# Altium PCB PMI_carte_principale.PcbDoc
Units mil, origin at the board's own origin, x right, y up, seen from the top; angles counter-clockwise.
Board outline 2362.21 x 3543.31 mil, 2 copper layers (Top Layer, Bottom Layer); 41 components, 46 nets, 174 pads, 3 vias.
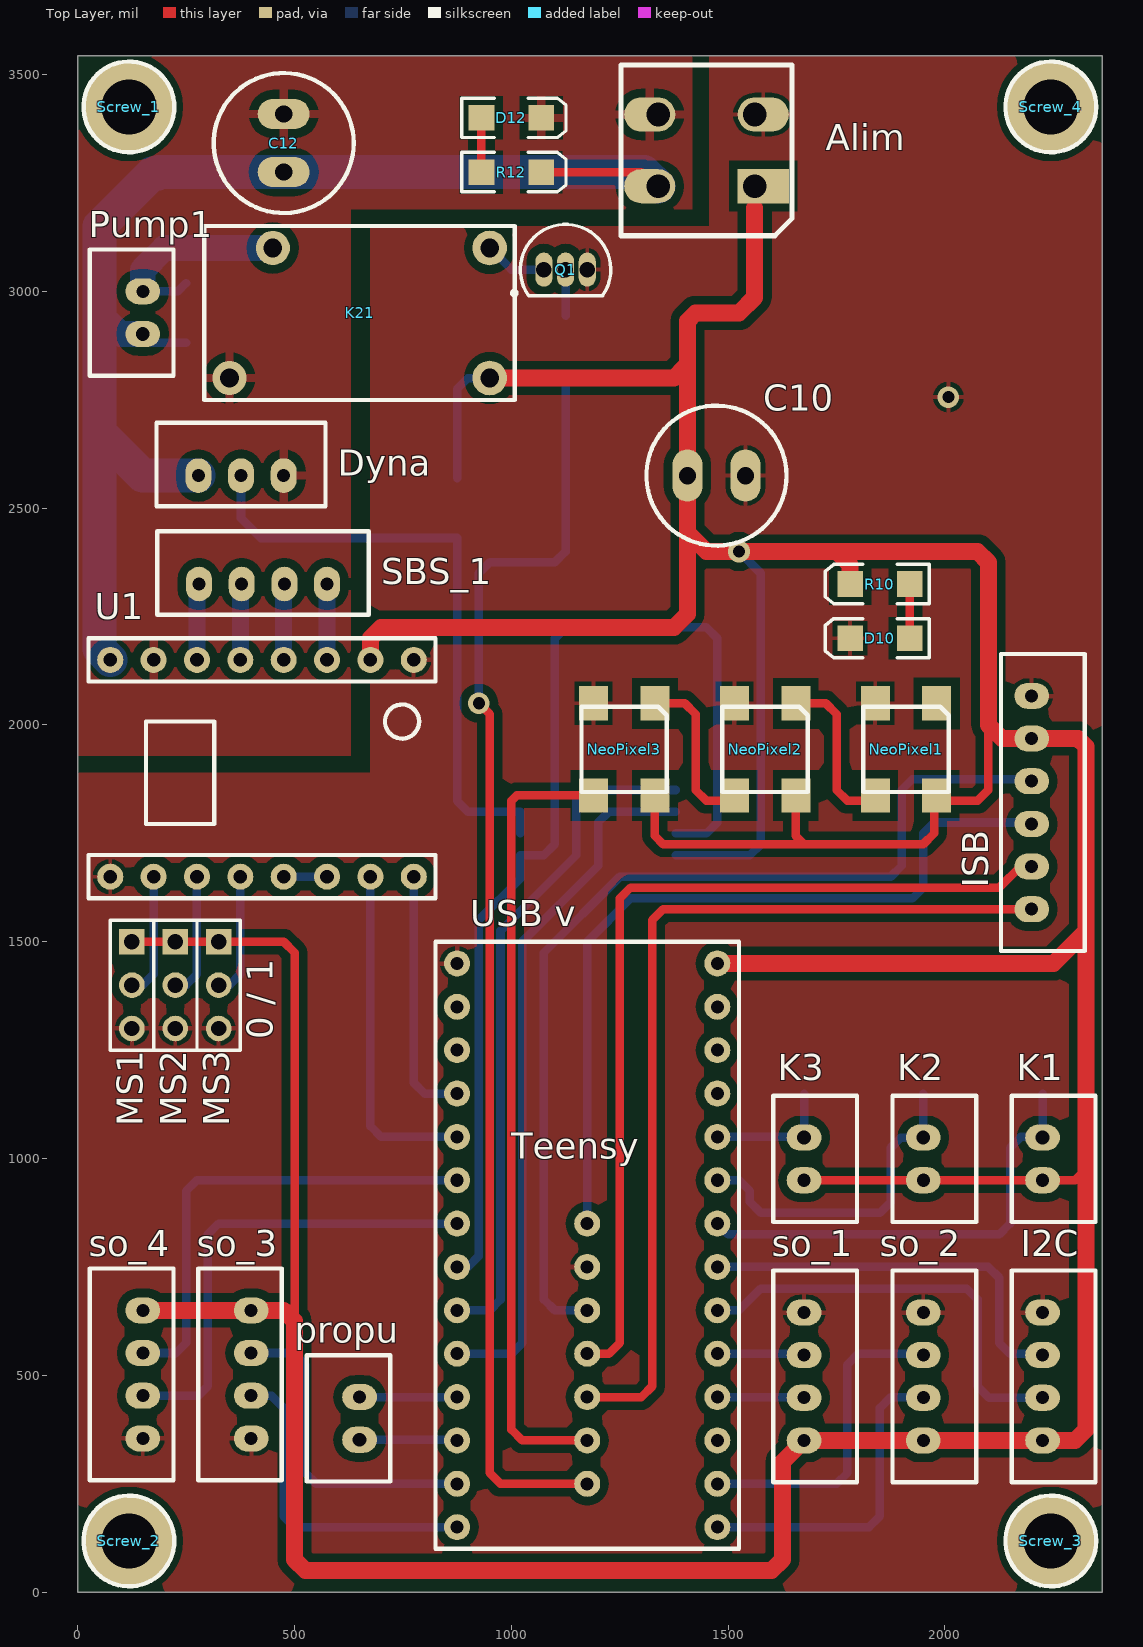
[diagram p0: Top Layer view]
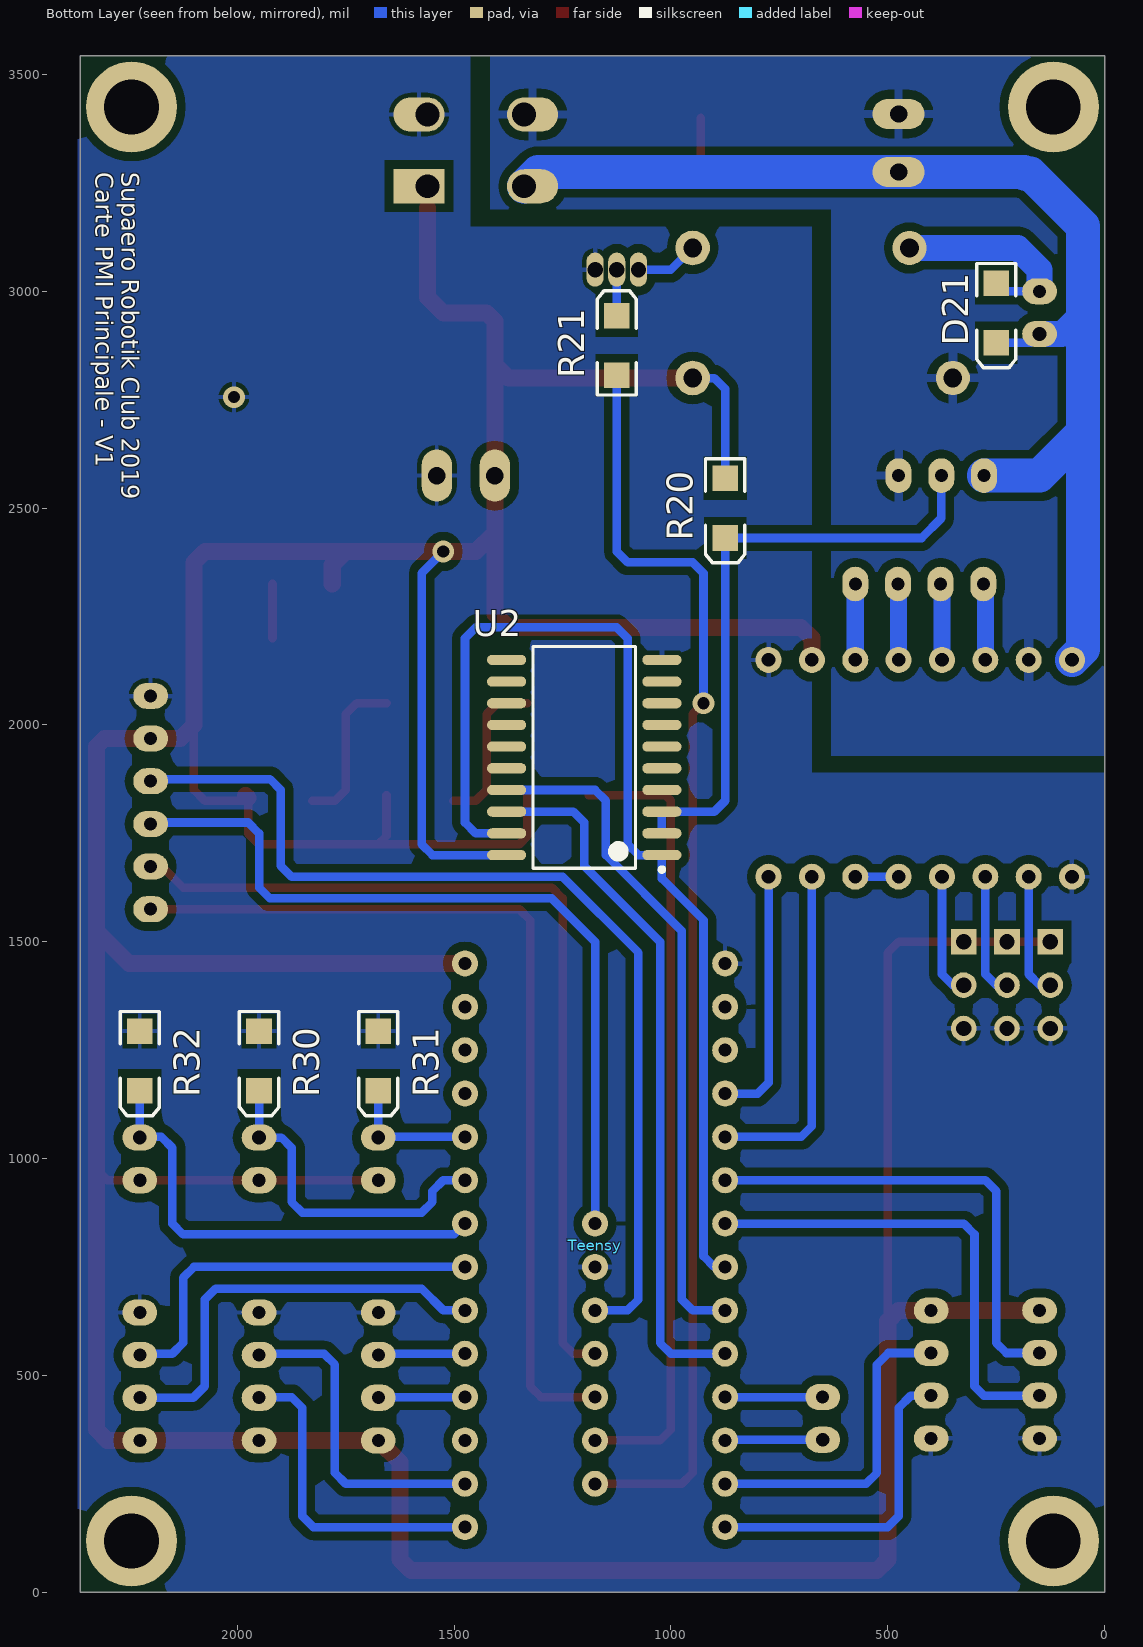
[diagram p1: Bottom Layer view, seen from below]
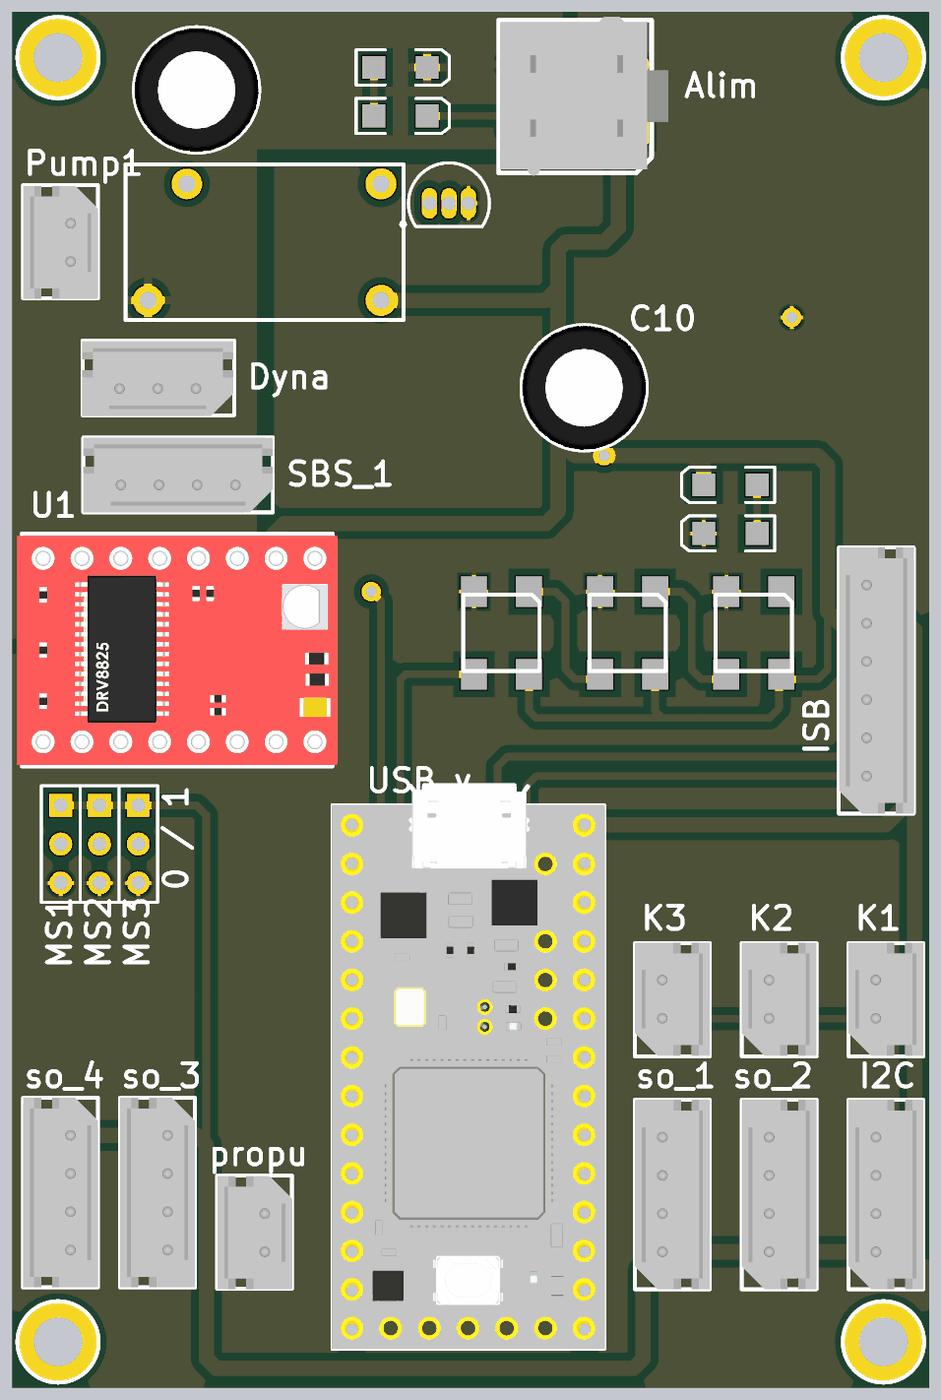
[diagram p2: 3D render of the assembled board from above, using the file's embedded part models]

## Layer stack, top to bottom
Top Solder: solder mask 0.4, Solder Resist, Dk 3.5
Top Layer: signal copper 1.4
Dielectric 1: dielectric 12.6, FR-4, Dk 4.8
Bottom Layer: signal copper 1.4
Bottom Solder: solder mask 0.4, Solder Resist, Dk 3.5

## Board outline
0,0 2362.2,0 2362.21,3543.31 0,3543.31

## Design rules (kind name [scope] priority, off if disabled: settings)
Clearance [All] p1: gap=10 except(20: Arc-Poly Track-Poly SMDPad-Poly THPad-Poly Via-Poly Fill-Poly Poly-Poly Poly-Region Poly-Text)
ComponentClearance Clearance_MS [HasFootprint('HDR1X3') vs HasFootprint('HDR1X3')] p1: gap=0 collisioncheckmode=3 verticalgap=0 showdistances=FALSE
ComponentClearance ComponentClearance_1 [All] p2: gap=10 collisioncheckmode=3 verticalgap=10 showdistances=FALSE
PolygonConnect GN_A [InNet('MASSE_A')] p1: connectstyle=Relief reliefconductorwidth=20 reliefentries=4 polygonreliefangle="90 Angle" airgapwidth=20
PolygonConnect PolygonConnect_1 [All] p2: connectstyle=Relief reliefconductorwidth=10 reliefentries=4 polygonreliefangle="90 Angle" airgapwidth=10
RoutingVias [All] p1: holewidth=28 width=50 viastyle="Through Hole" minholewidth=28 minwidth=50 maxholewidth=28 maxwidth=50
SolderMaskExpansion [All] p1: expansion=4
Width [All] p1: maxlimit=78.74 minlimit=9.84 preferedwidth=19.68
29 further rules are at their usual default settings.

## Components (designator, comment, footprint, x,y, rotation, side; value= is the part's Value field where it differs from the comment)
Alim "Header 4" MOLEX_MINIFITJR_2X2 1450,3325 r90 top
C10 "Cap" CONDENSATEUR 1406.1,2575 r0 top
C12 "Cap" CONDENSATEUR 475,3275 r90 top
D10 "LED0" 3.2X1.6X1.1 1850,2200 r180 top
D12 "LED0" 3.2X1.6X1.1 1000,3400 r0 top
D21 "Diode" 3.2X1.6X1.1 250,2950 r270 bottom
Dyna "Header 3" "MOLEX SPOX 3x1 M" 475,2575 r180 top
I2C "Header 4H" "MOLEX SPOX 4X1 M" 2225,350 r90 top
ISB "Header 6H" "MOLEX SPOX 6X1 M" 2200,1575 r90 top
K1 "Header 2H" "MOLEX SPOX 2X1 M" 1950,950 r90 top
K2 "Header 2H" "MOLEX SPOX 2X1 M" 1675,950 r90 top
K3 "Header 2H" "MOLEX SPOX 2X1 M" 2225,950 r90 top
K21 "Relay-SPST" RELAY 650,2950 r270 top
MS1 "Header 3" HDR1X3 125,1500 r270 top
MS2 "Header 3" HDR1X3 225,1500 r270 top
MS3 "Header 3" HDR1X3 325,1500 r270 top
NeoPixel1 "NeoPixel1" NEOPIXEL 1981,2050 r270 top
NeoPixel2 "NeoPixel2" NEOPIXEL 1656,2050 r270 top
NeoPixel3 "NeoPixel3" NEOPIXEL 1331,2050 r270 top
propu "Header 2" "MOLEX SPOX 2X1 M" 650,450 r270 top
Pump1 "Header 2H" "MOLEX SPOX 2X1 M" 150,3000 r270 top
Q1 "NPN" TO-226-AA 1125,3050 r270 top
R10 "Res_5V_A" 3.2X1.6X1.1 1850,2325 r180 top
R12 "Res_5V_A" 3.2X1.6X1.1 1000,3275 r0 top
R20 "Res_5V_A" 3.2X1.6X1.1 875,2500 r270 bottom
R21 "ResP" 3.2X1.6X1.1 1125,2875 r90 bottom
R30 "Res1" 3.2X1.6X1.1 1950,1225 r270 bottom
R31 "Res1" 3.2X1.6X1.1 1675,1225 r270 bottom
R32 "Res1" 3.2X1.6X1.1 2225,1225 r270 bottom
SBS_1 "Header 4" "MOLEX SPOX 4x1 M" 575,2325 r180 top
Screw_1 "Screw M3" "SCREW M3" 118.11,3425.2 r90 top
Screw_2 "Screw M3" "SCREW M3" 118.11,118.11 r90 top
Screw_3 "Screw M3" "SCREW M3" 2244.09,118.11 r90 top
Screw_4 "Screw M3" "SCREW M3" 2244.09,3425.2 r90 top
so_1 "Header 4H" "MOLEX SPOX 4X1 M" 1675,350 r90 top
so_2 "Header 4H" "MOLEX SPOX 4X1 M" 1950,350 r90 top
so_3 "Header 4H" "MOLEX SPOX 4X1 M" 400,650 r270 top
so_4 "Header 4H" "MOLEX SPOX 4X1 M" 150,650 r270 top
Teensy "Teensy 3.2" teensy 775,650 r0 bottom locked
U1 "Steper_Driver" DRV8825 75,1650 r90 top
U2 "SN74LS241DW" DW020_N 1200,1925 r0 bottom

## Footprints (in the part's own frame and the unit in brackets; to place one, negate y for a bottom-side part, rotate by r counter-clockwise, add the part's x,y. Pads: shape width x height; smd on the part's side, far side on the other; paste and mask are expansions set on the pad)
3.2X1.6X1.1 [mm] "SMT LED; 2 Flat Leads"
  rect 1.5x1.5 smd: 1(-1.75,0) 2(1.75,0)
  silkscreen extent -2.9,-1.15 3.2,1.15
CONDENSATEUR [mil]
  oval 70x120 hole 40: 1(0,0) 2(133.86,0)
  silkscreen extent -94,-161 228,161, body extent -93,-160 227,160, height 500
DRV8825 [mil] "Stepper Driver"
  round 60 hole 31.5: 1(0,0) 2(0,-100) 3(0,-200) 4(0,-300) 5(0,-400) 6(0,-500) 7(0,-600) 8(0,-700) 9(500,-700) 10(500,-600) 11(500,-500) 12(500,-400) 13(500,-300) 14(500,-200) 15(500,-100) 16(500,0)
  silkscreen extent -50,-750 550,50, body extent -50,-764 550,63, height 446
DW020_N [mm] "SOIC, 20-Leads, Body 12.8x7.5mm, Pitch 1.27mm, IPC Medium Density"
  oval 2.3x0.6 smd: 1(-4.55,5.715) 2(-4.55,4.445) 3(-4.55,3.175) 4(-4.55,1.905) 5(-4.55,0.635) 6(-4.55,-0.635) 7(-4.55,-1.905) 8(-4.55,-3.175) 9(-4.55,-4.445) 10(-4.55,-5.715) 11(4.55,-5.715) 12(4.55,-4.445) 13(4.55,-3.175) 14(4.55,-1.905) 15(4.55,-0.635) 16(4.55,0.635) 17(4.55,1.905) 18(4.55,3.175) 19(4.55,4.445) 20(4.55,5.715)
  silkscreen extent -4.67,-6.5 3,6.69, body extent -3.75,-6.5 3.75,6.5, height 2.65
HDR1X3 [mm] "Connector; Header; 3 Position"
  rect 1.5x1.5 hole 0.9: 1(0,0)
  round 1.5 hole 0.9: 2(2.54,0) 3(5.08,0)
  silkscreen extent -1.27,-1.27 6.35,1.27
"MOLEX SPOX 2X1 M" [mil]
  oval 60x80 hole 30: 1(0,0)
  oval 60x80 hole 31.5: 2(98.43,0)
  silkscreen extent -96,-122 195,71, body extent -95,-121 196,71, height 230
"MOLEX SPOX 3x1 M" [mil]
  oval 60x80 hole 30: 1(0,0) 2(98.43,0) 3(196.85,0)
  silkscreen extent -96,-122 293,71, body extent -95,-120 295,73, height 226
"MOLEX SPOX 4X1 M" [mil]
  oval 60x80 hole 30: 1(0,0) 2(98.43,0) 3(196.85,0) 4(295.28,0)
  silkscreen extent -96,-122 392,71, body extent -96,-122 392,71, height 226
"MOLEX SPOX 4x1 M" [mil]
  oval 60x80 hole 30: 1(0,0) 2(98.43,0) 3(196.85,0) 4(295.28,0)
  silkscreen extent -96,-122 392,71, body extent -96,-122 392,71, height 226
"MOLEX SPOX 6X1 M" [mil]
  oval 60x80 hole 30: 1(0,0) 2(98.43,0) 3(196.85,0) 4(295.28,0) 5(393.7,0) 6(492.13,0)
  silkscreen extent -96,-122 589,71, body extent -96,-123 589,70, height 226
MOLEX_MINIFITJR_2X2 [mm] "Conecteur puissance 2x2"
  rect 2x3 hole 1.4 copper offset 0,-0.5: 1(-2.1,-2.825)
  oval 2x3 hole 1.4 copper offset 0,0.5: 2(-2.1,2.825) 4(2.1,2.825)
  oval 2x3 hole 1.4 copper offset 0,-0.5: 3(2.1,-2.825)
  silkscreen extent -5,-5 5,5, body extent -5.18,-6.1 5.22,4.9, height 12.8
NEOPIXEL [mm]
  rect 2x1.7 smd: 1(0,0) 2(0,-3.6) 3(5.4,-3.6) 4(5.4,0)
  silkscreen extent 0.2,-4.3 5.2,0.7, body extent 0.19,-4.33 5.19,0.67, height 2
RELAY [mm] "SPST-NO Relay"
  round 2 hole 1.1: 1(3.81,-7.62) 2(-3.81,-5.08)
  round 2.032 hole 1.1: 3(-3.81,7.62) 4(3.81,7.62)
  silkscreen extent -5.09,-9.09 5.09,9.09, body extent -5.08,-9.14 5.08,9.14, height 15
"SCREW M3" [mm] "M3 iso Screw"
  round 5.32 hole 3.2 unplated: 0(0,0)
  silkscreen extent -2.66,-2.66 2.66,2.66
teensy [mil] "Teensy 3.2"
  round 60 hole 30: 0(100,-700) 1(100,-600) 2(100,-500) 3(100,-400) 4(100,-300) 5(100,-200) 6(100,-100) 7(100,0) 8(100,100) 9(100,200) 10(100,300) 11(100,400) 12(100,500) 13(700,500) 14(700,400) 15(700,300) 16(700,200) 17(700,100) 18(700,0) 19(700,-100) 20(700,-200) 21(700,-300) 22(700,-400) 23(700,-500) 24(400,0) 25(400,100) 26(400,200) 27(400,300) 28(400,400) 36(400,-200) 40(400,-100) 41(700,-600) 42(700,-700) 43(700,-800) 44(100,-800)
  body extent 48,-907 752,550, height 505
TO-226-AA [mm] "TO, Flat Index; 3 In-Line, Axial Leads; Body Dia. 4.8mm; Leads 0.55 x 0.51 mm (max)"
  oval 2x1 hole 0.9: 1(0,-1.27) 2(0,0) 3(0,1.27)
  silkscreen extent -2.65,-3.13 1.52,2.65, body extent -2.65,-2.66 1.52,2.66, height 5.33

## Part data
Alim SBS_1: "Header, 4-Pin"
C10 C12: "Capacitor"
D10 D12: "Typical INFRARED GaAs LED"
D21: "Default Diode"
Dyna MS1 MS2 MS3: "Header, 3-Pin"
I2C so_1 so_2 so_3 so_4: "Header, 4-Pin, Right Angle"
ISB: "Header, 6-Pin, Right Angle"
K1 K2 K3 Pump1: "Header, 2-Pin, Right Angle"
K21: "Single-Pole Single-Throw Relay"
NeoPixel1 NeoPixel2 NeoPixel3: library part NeoPixel
propu: "Header, 2-Pin"
Q1: "NPN Bipolar Transistor"
R10 R12 R20 R21: library part Res1, "Resistor"
R30 R31 R32: "Resistor"
Teensy: library part teensy3.2
U1: "A4988"
U2: "Octal Buffer and Line Driver with 3-State Outputs"

## Via types
v1: diameter 50, hole 28, Top Layer to Bottom Layer, 3 vias

## Nets (pads, with @x,y where several pads share a name; then routed paths per layer and width w, separated by ;. In a path a pad name is that pad's centre, name@x,y a point inside that pad or via, vN(x,y) a via of type N, cw(c..) or ccw(c..) an arc to the next point about the centre after c; other vN are vias at no path point)
1A: SBS_1.2 U1.12 | length 170.3
  Bottom Layer w39.37: U1.12 SBS_1.2@475,2320.28
1B: SBS_1.1 U1.11 | length 170.3
  Bottom Layer w39.37: U1.11 SBS_1.1@575,2320.28
2A: SBS_1.3 U1.13 | length 170.3
  Bottom Layer w39.37: U1.13 SBS_1.3@375,2320.28
2B: SBS_1.4 U1.14 | length 170.3
  Bottom Layer w39.37: U1.14 SBS_1.4@275,2320.28
5V_L: Alim.1 C10.1 I2C.1 ISB.5 K1.1 K2.1 K3.1 K21.4 MS1.1 MS2.1 MS3.1 NeoPixel1.4 NeoPixel2.4 NeoPixel3.4 R10.2 R20.1 so_1.1 so_2.1 so_3.1 so_4.1 Teensy.43 U1.10 U2.20 | length 13563.2
  Top Layer w19.68: MS1.1 475,1500 500,1475 500,625 ; NeoPixel3.4 1331,1744 1350,1725 1675,1725 ; NeoPixel2.4 1656,1744 1675,1725 ; K2.1 K1.1 K3.1 2300,950 2325,975 ; NeoPixel1.4@1975,1825 2075,1825 2100,1850 2100,2000 ; NeoPixel1.4@1975,1831.4 1975,1750 1950,1725 1675,1725
  Top Layer w39.37: so_4.1 so_3.1 475,650 500,625 500,75 525,50 1600,50 1625,75 1625,300 so_1.1 so_2.1 I2C.1 2300,350 2325,375 2325,1525 ; U1.10 675,2200 700,2225 1375,2225 1406.1,2256.1 1406.1,2443.9 ; K21.4 1375,2800 1400,2825 ; Teensy.43 2250,1450 2325,1525 ; 1561.22,3192.32 1561.22,2986.22 1525,2950 1425,2950 1406.1,2931.1 C10.1 1406.1,2443.9 ; R10.2 1781.1,2368.9 1750,2400 ; NeoPixel1.4@1975,1831.4 NeoPixel1.4 ; 1406.1,2443.9 1450,2400 v1(1525,2400) 1750,2400 ; 1750,2400 2075,2400 2100,2375 2100,2000 2131.3,1968.7 ISB.5 2306.3,1968.7 2325,1950 2325,1525
  Bottom Layer w19.68: R20.1 875,2775 900,2800 K21.4 ; U2.20 1550,1700 1575,1725 1575,2350 v1(1525,2400)
12V_A: Alim.2 C12.1 D21.2 Dyna.3 Pump1.2 R12.2 U1.16 | length 3146
  Top Layer w19.68: R12.2 1300,3275 1332.68,3242.32 Alim.2
  Bottom Layer w19.68: Pump1.2 170.47,2881.1 D21.2
  Bottom Layer w59.06: 50,2950 98.43,2901.57 Pump1.2
  Bottom Layer w78.74: U1.16 50,2175 50,2675 ; Dyna.3 150,2575 50,2675 ; Alim.2 1306.1,3275 C12.1 185.84,3275 181.94,3271.1 171.1,3271.1 50,3150 50,2675
BUTé_BOUT: K2.2 R31.2 Teensy.22 | length 302.2
  Bottom Layer w19.68: Teensy.22 1673.43,1050 K2.2 R31.2@1675,1150
BUTé_DéBUT: K3.2 R32.2 Teensy.20 | length 1056.1
  Bottom Layer w19.68: Teensy.20 1500,825 2125,825 2150,850 2150,1025 2175,1050 K3.2@2223.43,1050 ; K3.2 R32.2@2225,1150
CTRL_P: R21.1 Teensy.28 | length 2947.5
  Top Layer w19.68: v1(925,2050) 950,2025 950,275 975,250 Teensy.28
  Bottom Layer w19.68: v1(925,2050) 925,2350 950,2375 1100,2375 1125,2400 R21.1
DATA: ISB.4 Teensy.24 | length 2298.8
  Bottom Layer w19.68: Teensy.24 1100,650 1075,675 1075,1475 1250,1650 1875,1650 1900,1675 1900,1850 1925,1875 ISB.4@2195.28,1875
DATA_NEOPI: NeoPixel3.3 Teensy.27 | length 1829.8
  Top Layer w19.68: Teensy.27 1025,350 1000,375 1000,1825 1012.4,1837.4 NeoPixel3.3
DATA_SERVO: Dyna.2 R20.2 U2.2 U2.3 | length 1428
  Bottom Layer w19.68: Dyna.2 376.57,2476.57 422.05,2431.1 R20.2 875,1825 900,1800 U2.3 U2.2
DATA_SERVO_CTRL: Teensy.6 U2.1 U2.19 | length 2516.5
  Bottom Layer w19.68: Teensy.6 900,750 925,775 925,1550 1020.87,1645.87 U2.1 1075,1700 1100,1725 1100,2200 1125,2225 1450,2225 1475,2200 1475,1775 1450,1750 U2.19
DETECT_PALET: K1.2 R30.2 Teensy.21 | length 767.3
  Bottom Layer w19.68: Teensy.21 1525,950 1550,925 1550,900 1575,875 1850,875 1875,900 1875,1025 1898.43,1048.43 K1.2 R30.2@1950,1150
DIR: Teensy.2 U1.8 | length 585.4
  Bottom Layer w19.68: U1.8 775,1175 800,1150 Teensy.2
ECHO_1: so_1.3 Teensy.17 | length 196.9
  Bottom Layer w19.68: Teensy.17 so_1.3@1671.85,550
ECHO_2: so_2.3 Teensy.14 | length 747
  Bottom Layer w19.68: Teensy.14 1750,250 1775,275 1775,525 1800,550 1946.85,550 so_2.3
ECHO_3: so_3.3 Teensy.12 | length 747
  Bottom Layer w19.68: so_3.3 446.85,453.15 475,425 475,175 500,150 Teensy.12
ECHO_4: so_4.3 Teensy.5 | length 1094.4
  Bottom Layer w19.68: so_4.3 278.15,453.15 300,475 300,825 325,850 Teensy.5
HORLOGE: ISB.2 Teensy.25 | length 2089.8
  Top Layer w19.68: Teensy.25 1225,550 1250,575 1250,1600 1275,1625 2125,1625 2175,1675 ISB.2@2198.43,1675
LEDS: ISB.1 Teensy.26 | length 2120.7
  Top Layer w19.68: Teensy.26 1300,450 1325,475 1325,1550 1350,1575 ISB.1
MASSE_A: Alim.4 C12.2 D12.2 Dyna.1 K21.1 U1.15
MASSE_L: Alim.3 C10.2 D10.2 I2C.4 ISB.6 MS1.3 MS2.3 MS3.3 NeoPixel1.2 NeoPixel2.2 NeoPixel3.2 Q1.3 R30.1 R31.1 R32.1 so_1.4 so_2.4 so_3.4 so_4.4 Teensy.40 Teensy.44 U1.1 U1.9 U2.10
  other v1: 2007.87,2755.91
MS1: MS1.2 U1.2 | length 285.4
  Bottom Layer w19.68: MS1.2 150,1400 175,1425 U1.2
MS2: MS2.2 U1.3 | length 285.4
  Bottom Layer w19.68: MS2.2 250,1400 275,1425 U1.3
MS3: MS3.2 U1.4 | length 285.4
  Bottom Layer w19.68: MS3.2 350,1400 375,1425 U1.4
NetD10_1: D10.1 R10.1 | length 125
  Top Layer w19.68: D10.1 R10.1
NetD12_1: D12.1 R12.1 | length 125
  Top Layer w19.68: R12.1 D12.1
NetD21_1: D21.1 K21.2 Pump1.1 | length 478.5
  Bottom Layer w19.68: Pump1.1 231.1,3000 D21.1
  Bottom Layer w59.06: Pump1.1 150,3050 200,3100 K21.2
NetK21_3: K21.3 Q1.1 | length 145.7
  Bottom Layer w19.68: K21.3 1000,3050 Q1.1
NetNeoPixel1_3: NeoPixel1.3 NeoPixel2.1 | length 366.6
  Top Layer w19.68: NeoPixel2.1 1725,2050 1750,2025 1750,1850 1775,1825 NeoPixel1.3@1826.87,1825
NetNeoPixel2_3: NeoPixel2.3 NeoPixel3.1 | length 366.6
  Top Layer w19.68: NeoPixel3.1 1400,2050 1425,2025 1425,1850 1450,1825 NeoPixel2.3@1501.87,1825
NetQ1_2: Q1.2 R21.2 | length 106.1
  Bottom Layer w19.68: R21.2 Q1.2
NetU1_5: U1.5 U1.6 | length 100
  Bottom Layer w19.68: U1.5 U1.6
RX: propu.1 Teensy.9 | length 225
  Bottom Layer w19.68: propu.1 Teensy.9
RX_SERVO: Teensy.8 U2.18 | length 1622.3
  Bottom Layer w19.68: Teensy.8 1000,550 1025,575 1025,1500 1200,1675 1200,1775 1225,1800 U2.18
SCL: I2C.3 Teensy.19 | length 917.6
  Bottom Layer w19.68: Teensy.19 2100,750 2125,725 2125,575 2150,550 I2C.3@2221.85,550
SDA: I2C.2 Teensy.18 | length 992.1
  Bottom Layer w19.68: Teensy.18 1525,650 1575,700 2050,700 2075,675 2075,475 2101.57,448.43 I2C.2
SET: ISB.3 Teensy.36 | length 1859
  Bottom Layer w19.68: Teensy.36 1175,1500 1275,1600 1925,1600 1950,1625 1950,1750 1975,1775 ISB.3@2196.85,1775
STEP: Teensy.3 U1.7 | length 785.4
  Bottom Layer w19.68: U1.7 675,1075 700,1050 Teensy.3
TRIG_1: so_1.2 Teensy.16 | length 198.4
  Bottom Layer w19.68: Teensy.16 so_1.2@1673.43,450
TRIG_2: so_2.2 Teensy.13 | length 746.4
  Bottom Layer w19.68: Teensy.13 1825,150 1850,175 1850,425 1875,450 1948.43,450 so_2.2
TRIG_3: so_3.2 Teensy.11 | length 746.4
  Bottom Layer w19.68: so_3.2 498.43,551.57 525,525 525,275 550,250 Teensy.11
TRIG_4: so_4.2 Teensy.4 | length 1095.1
  Bottom Layer w19.68: so_4.2 226.57,551.57 250,575 250,925 275,950 Teensy.4
TX: propu.2 Teensy.10 | length 223.4
  Bottom Layer w19.68: propu.2 Teensy.10@873.43,351.57
TX_SERVO: Teensy.7 U2.17 | length 1572.3
  Bottom Layer w19.68: Teensy.7 950,650 975,675 975,1525 1150,1700 1150,1825 1175,1850 U2.17
pads on no net: NeoPixel1.1 Screw_1.0 Screw_2.0 Screw_3.0 Screw_4.0 Teensy.0 Teensy.1 Teensy.15 Teensy.23 Teensy.41 Teensy.42 U2.4 U2.5 U2.6 U2.7 U2.8 U2.9 U2.11 U2.12 U2.13 U2.14 U2.15 U2.16

## Polygon pours and split planes (outlines as drawn)
MASSE_L on Top Layer "Top GND_L" (solid, pour order 0): 0,0 2362.2,0 2362.2,3543.31 1456.69,3543.31 1456.69,3149.61 675,3149.61 675,1889.76 0,1889.76
MASSE_A on Top Layer "Top GND_A" (solid, remove dead copper, pour order 4): 0,3543.31 1417.32,3543.31 1417.32,3188.98 629.92,3188.98 629.92,1929.13 0,1929.13
MASSE_L on Bottom Layer "Bop GND_L" (solid, pour order 2): 0,-0.2 2368.11,-0.2 2368.11,3543.11 1462.6,3543.11 1462.6,3149.41 675,3149.41 675,1889.57 0,1889.57
MASSE_A on Bottom Layer "Bop GND_A" (solid, remove dead copper, pour order 6): 0,3543.31 1417.32,3543.31 1417.32,3188.98 629.92,3188.98 629.92,1929.13 0,1929.13

## Silkscreen, mask and mechanical layers (free items; w line width, h text height)
Top Overlay:
  circle w10: c748.03,2007.87 r39.37
  lines w10: 157.48,1771.65 314.96,1771.65 314.96,2007.87 157.48,2007.87 157.48,1771.65
  text "USB v" at 905.51,1535.43 h60
  text "0 / 1" at 450,1275 h60 r90
Bottom Overlay:
  text "Supaero Robotik Club 2019 / Carte PMI Principale - V1" at 2326.57,3274.61 h40 r90
Mechanical 2:
  the board outline again, w10

## Dimensions
0,3543.31 to 2362.21,3543.31 on Mechanical 3
0,3543.31 to 0,0 on Mechanical 3